# Altium PCB OpenRex_V1I1_PCB.PcbDoc (part 8 of 12)
Units mm, origin at the board's own origin, x right, y up, seen from the top; angles counter-clockwise.
Board outline 70 x 95 mm, 10 copper layers (L1, L2, L3, L4 (PWR), L5 (PWR), L6 (PWR), L7 (PWR), L8, L9, L10), stack 1.632 mm thick; 1080 components, 708 nets, 3831 pads, 2373 vias.
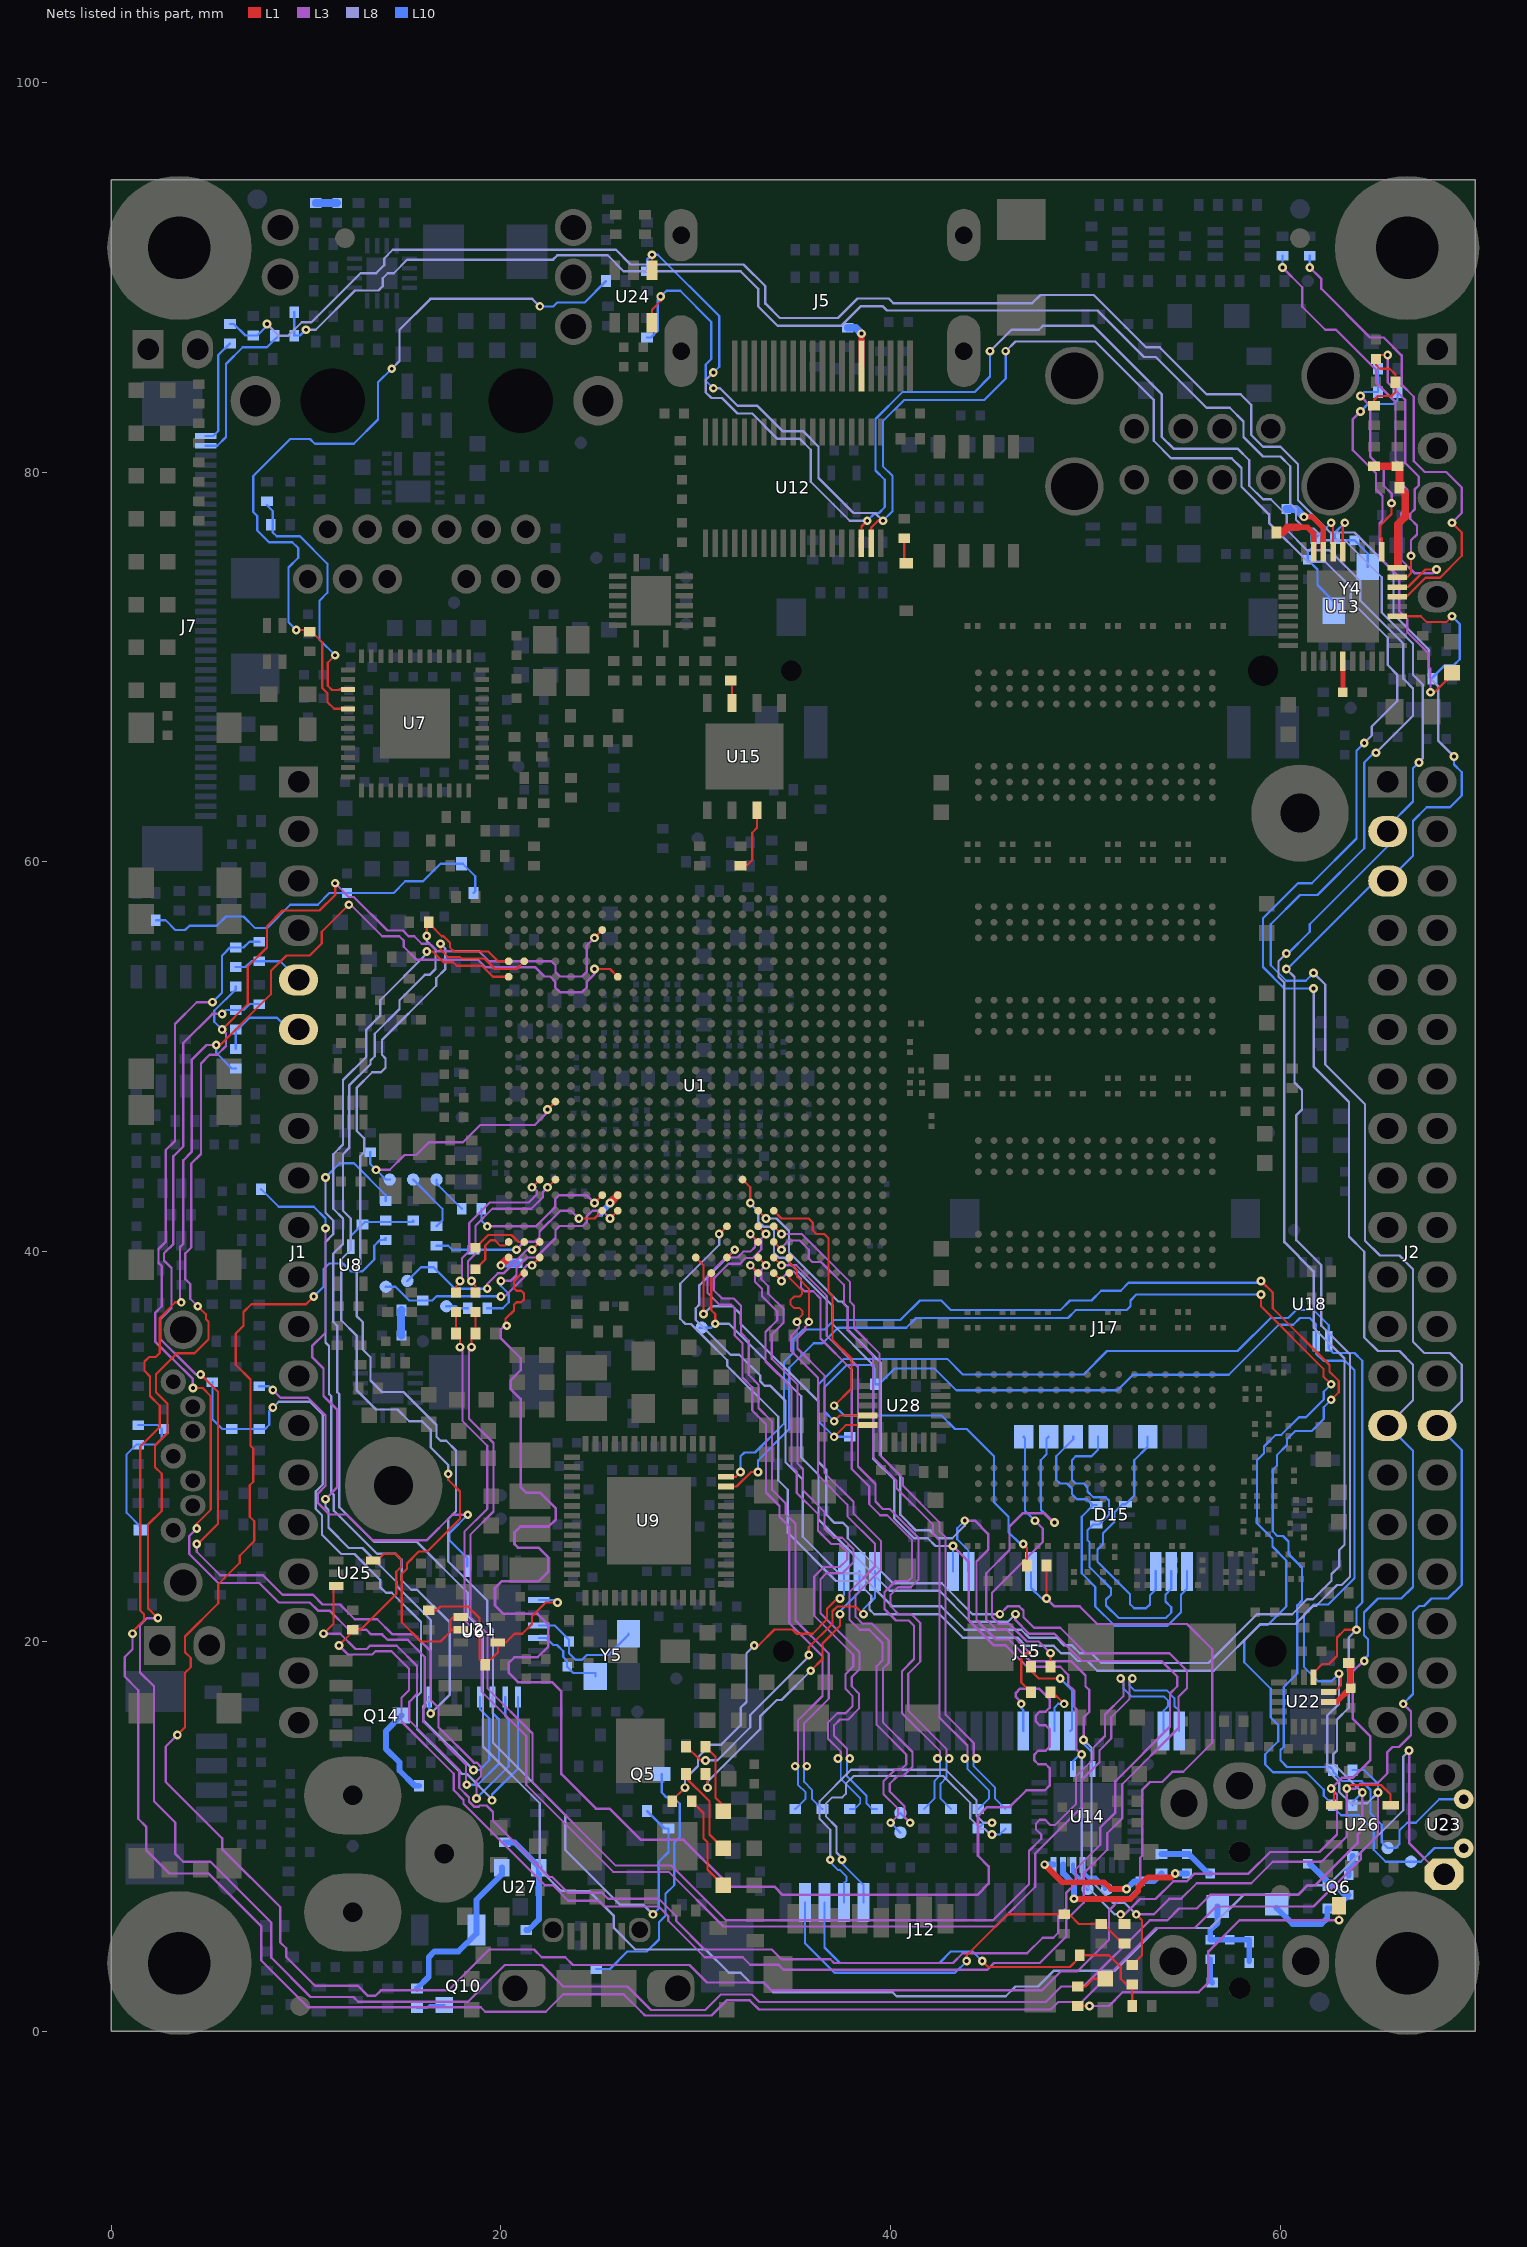
[diagram p16: the nets of this part, all layers, seen from the top]

## Via types
v1: diameter 0.45, hole 0.2, L1 to L10, tented both sides, 2369 vias
v2: diameter 1, hole 0.5, L1 to L10, tented top, 4 vias

## Nets (pads, with @x,y where several pads share a name; then routed paths per layer and width w, separated by ;. In a path a pad name is that pad's centre, name@x,y a point inside that pad or via, vN(x,y) a via of type N, cw(c..) or ccw(c..) an arc to the next point about the centre after c; other vN are vias at no path point) (continued)
HP_OUT_L: C285.1 C289.1 C290.2 FB22.1 R231.2 | length 5
  L10 w0.3: C290.2@56.775,6.4 56.775,5.575 56.4,5.2 C285.1@56.4,4.7 C289.1@57.4,4.7 58.4,4.7 FB22.1@58.4,3.6
HP_OUT_R: C284.1 C288.1 C291.2 FB21.1 R230.2 | length 7.7
  L10 w0.3: C291.2@59.8,6.325 60.625,5.5 62.1,5.5 62.4,5.8 C288.1@62.4,6.3 62.8,6.3 C284.1@63.5,7 63.3,7 62.8,7.5 62.5,7.5 62.5,7.6 FB21.1@61.5,8.6
HUB_CFG_SEL0: R221.2 U13.24 | length 24.3
  L1 w0.114: U13.24@66,73.6 66.462,73.6 67.442,74.58 68.18,74.58 69.3,75.7 69.3,76.9 v1(68.8,77.4)
  L3 w0.12: v1(61.5,90.5) 62.1,89.9 62.1,89.4 64.6,86.9 65.3,86.9 66.215,85.985 66.215,84.485 66.84,83.86 66.84,80.56 67.4,80 68.5,80 69.3,79.2 69.3,77.9 v1(68.8,77.4)
  L10 w0.114: v1(61.5,90.5) R221.2@61.5,91.1
HUB_CFG_SEL1: R220.2 U13.25 | length 23.2
  L1 w0.114: U13.25@66,74.1 66.544,74.1 67.444,75 v1(68,75)
  L3 w0.12: v1(60.1,90.5) 61.115,89.485 61.115,88.485 62.3,87.3 62.844,87.3 64.9,85.244 64.9,84.6 65.9,83.6 65.9,80.6 66.1,80.4 66.1,79.5 66.5,79.1 66.5,78.2 66.2,77.9 66.2,75.5 66.9,74.8 67.8,74.8 v1(68,75)
  L10 w0.114: v1(60.1,90.5) R220.2@60.1,91.1
HUB_CRFILT: C254.1 U13.14 | length 1.6
  L1 w0.25: C254.1@63.2,68.7 U13.14@63.2,70.3
HUB_LED: D12.2 R219.1 | length 20.4
  L1 w0.114: v1(67.7,68.7) 67.9,68.7 68.8,69.6 D12.2@68.8,69.7
  L3 w0.12: v1(64.1,83.1) 63.715,82.715 63.715,81.12 64.9,79.935 64.9,79.1 65.235,78.765 65.235,77.535 65.1,77.4 65.1,75.6 66.1,74.6 66.1,72.86 66.5,72.46 66.5,71.8 67.6,70.7 67.6,70 67.7,69.9 v1(67.7,68.7)
  L10 w0.114: v1(64.1,83.1) 64.485,83.485 65.785,83.485 66,83.7 R219.1@66,84.1
HUB_NON_REM1: R224.2 U13.22 | length 7.3
  L1 w0.114: U13.22@66,72.6 67.2,72.6 67.5,72.3 68.5,72.3 v1(68.8,72.6)
  L10 w0.114: R224.2@67.8,69.4 67.8,69.456 68.444,70.1 68.9,70.1 69.2,70.4 69.2,72.2 v1(68.8,72.6)
HUB_PLLFILT: C253.1 U13.34 | length 3.5
  L1 w0.28: v1(61.2,77.7) 61.635,77.7 62.2,77.135 U13.34@62.2,75.9
  L10 w0.4: C253.1@60.3,78.1 60.8,78.1 v1(61.2,77.7)
HUB_RBIAS: R222.1 U13.35 | length 3.1
  L1 w0.28: 60.9,77.165 61.393,77.165 61.7,76.858 U13.35@61.7,75.9
  L1 w0.4: R222.1@59.8,76.9 60.1,76.9 60.365,77.165 60.9,77.165
HUB_RESETN: C416.1 R217.1 R218.1 U13.26 | length 17.8
  L1 w0.114: R217.1@64.8,83.4 64.8,83.7 65,83.9 65.7,83.9 65.9,84.1 R218.1@65.9,84.6 65.9,85 65.6,85.3 65.1,85.3 64.9,85.5 C416.1@64.9,85.8 65.1,86 v1(65.5,86) ; U13.26@66,74.6 66.5,74.6 66.7,74.8 v1(66.7,75.7)
  L3 w0.12: v1(65.5,86) 65.5,84.6 66.4,83.7 66.4,80.459 67.1,79.759 67.1,79.318 66.88,79.098 66.88,78.08 66.656,77.856 66.656,77.6 67,77.256 67,76.8 66.7,76.5 v1(66.7,75.7)
HUB_VBUS_DET: R169.1 R215.2 R216.1 U13.27 | length 6.7
  L1 w0.28: U13.27@66,75.1 U13.27@66,75.175
  L1 w0.4: R169.1@64.8,80.3 R215.2@66,80.3 66.1,80.2 R216.1@66.1,79.2 66.4,78.9 66.4,77.7 66.025,77.325 U13.27@66.025,75.175
HUB_XTALIN: C415.1 R358.2 U13.33 Y4.3 | length 7.1
  L1 w0.114: v1(62.6,77.4) 62.7,77.3 U13.33@62.7,75.9
  L10 w0.114: v1(62.6,77.4) R358.2@61.8,76.6 61.8,76.3 61.4,75.9 C415.1@61.4,75.5 61.9,75 61.9,74.2 62.725,73.375 Y4.3@62.725,72.875
HUB_XTALOUT: C242.1 R358.1 U13.32 Y4.1 | length 5.2
  L1 w0.114: U13.32@63.2,75.9 63.2,77.3 v1(63.3,77.4)
  L10 w0.114: v1(63.3,77.4) 62.8,76.9 R358.1@62.8,76.6 62.9,76.5 C242.1@63.8,76.5 64.475,75.825 Y4.1@64.475,75.125
I2C1_SCL: R132.1 R238.1 R278.1 U1.H20 U18.6 U22.4 U28.11 | length 218
  L1 w0.114: v1(1.1,20.4) 1.1,20.5 1.685,21.085 1.685,21.409 1.5,21.594 1.5,30 2.5,31 2.5,32.1 2,32.6 2,33.6 1.715,33.885 1.715,34.359 1.956,34.6 2.3,34.6 2.5,34.8 2.5,36.6 3.3,37.4 v1(3.6,37.4) ; v1(5.4,50.6) 5.6,50.6 8.2,53.2 8.2,54.4 9,55.2 10.2,55.2 10.815,55.815 10.815,56.415 v1(12.2,57.8) ; v1(24.8,54.5) 25.6,54.5 U1.H20@26,54.1 ; v1(37.1,31.3) 37.4,31.6 U28.11@38.825,31.6 ; U22.4@62.475,17.4 62.751,17.4 63.1,17.749 63.1,18.25 v1(63,18.35)
  L3 w0.12: v1(1.1,20.4) 1.1,19.6 0.7,19.2 0.7,18.2 1.4,17.5 1.4,10.9 1.8,10.5 1.8,9.3 3,8.1 5,8.1 7.7,5.4 7.7,3.644 10.109,1.235 18.965,1.235 19.2,1 22.3,1 23.2,1.9 26.3,1.9 27.2,1 27.39,0.81 30.8,0.81 31.575,1.585 32.775,1.585 33.245,1.115 48.215,1.115 48.6,1.5 49.8,1.5 53.6,5.3 55.6,5.3 56.7,6.4 61.7,6.4 64.115,8.815 64.115,9.171 65,10.056 v1(65,12.25) ; v1(3.6,37.4) 3.535,37.465 3.535,40.235 3.7,40.4 3.7,44.684 4.135,45.119 4.135,49.835 4.9,50.6 v1(5.4,50.6) ; v1(12.2,57.8) 12.3,57.8 13.915,56.185 14.789,56.185 15.015,55.959 15.015,55.641 15.671,54.985 18.815,54.985 19.2,54.6 21.756,54.6 22.241,54.115 22.529,54.115 22.785,53.859 22.785,53.571 23.041,53.315 24.159,53.315 24.415,53.571 24.415,53.859 24.8,54.244 v1(24.8,54.5)
  L8 w0.12: v1(63,18.35) 63,16.8 62.4,16.2 62.4,13.4 63.015,12.785 63.015,12.285 63.6,11.7 64.45,11.7 v1(65,12.25)
  L10 w0.114: v1(5.4,50.6) 5.4,50.2 6.2,49.4 R278.1@6.4,49.4 ; v1(37.1,31.3) 36.6,31.8 36.6,33.044 37.741,34.185 39.015,34.185 39.2,34 R132.1@39.2,33.2 39.4,33.2 40.2,34 42.256,34 43.371,32.885 51.635,32.885 52.435,33.685 57.341,33.685 59.906,36.25 60.65,36.25 61,36.6 61.5,36.6 61.825,36.275 U18.6@61.825,35.4 61.825,34.775 62.2,34.4 63.315,34.4 63.8,33.915 63.8,23.244 62.456,21.9 61.7,21.9 61.2,21.4 61.2,18.7 61.935,17.965 62.615,17.965 v1(63,18.35) ; R238.1@63.7,13.4 64.3,13.4 65,12.7 v1(65,12.25)
I2C1_SCL_CON: J1.6 R278.2 R279.2 | length 4.7
  L10 w0.114: R278.2@6.4,50.4 R279.2@6.4,51.4 6.5,51.4 7.1,52 8.52,52 9.12,51.4 J1.6@9.62,51.4
I2C1_SCL_MCU: R279.1 R291.1 U6.10 | length 62.3
  L1 w0.114: v1(4.4,25) 4.444,25 5.485,26.041 5.485,32.815 v1(4.6,33.7)
  L3 w0.12: v1(4.4,25) 4.4,24.6 5.6,23.4 7.8,23.4 8.8,22.4 10.356,22.4 10.856,21.9 11.74,21.9 12.5,21.14 13.66,21.14 14.435,20.365 15.535,20.365 16.415,19.485 16.415,16.985 16.8,16.6 16.8,15.6 18.615,13.785 18.759,13.785 18.985,13.559 18.985,13.085 18.75,12.85 v1(18.75,11.95) ; v1(4.6,33.7) 4.361,33.7 3.231,34.83 3.22,34.83 2.54,35.51 2.54,36.54 3.1,37.1 3.1,39.156 2.715,39.541 2.715,39.915 3.2,40.4 3.2,44.9 3.7,45.4 3.7,50.7 5.2,52.2 v1(5.7,52.2)
  L10 w0.114: v1(5.7,52.2) 5.9,52.4 R279.1@6.4,52.4 6.8,52.4 7.1,52.7 R291.1@7.6,52.7 ; v1(18.75,11.95) 20.4,13.6 20.4,16 20.225,16.175 U6.10@20.225,17.15
I2C1_SCL_PMIC: R238.2 TP18.1 U9.54 | length 78.2
  L1 w0.114: U9.54@31.55,28.45 32.05,28.45 v1(32.3,28.7) ; v1(59,38.5) 59.6,37.9 59.6,37.1 62.515,34.185 62.515,33.841 62.985,33.371 62.985,32.785 v1(62.6,32.4)
  L1 w0.4: v2@69.35,11.95 v2(69.4,11.9)
  L10 w0.114: v1(32.3,28.7) 32.3,29.5 32.5,29.7 33.044,29.7 34.52,31.176 34.52,34.32 35,34.8 35,35.5 35.5,36 36.6,36 37.1,36.5 40.5,36.5 41.5,37.5 42.6,37.5 43.1,37 48.7,37 49.2,37.5 50.3,37.5 50.8,38 51.8,38 52.2,38.4 58.9,38.4 v1(59,38.5) ; v1(62.6,32.4) 62.215,32.015 62.215,31.415 61.6,30.8 60.756,30.8 60.335,30.38 60.335,30.08 59.815,29.559 59.815,29.241 59.815,29.015 59.598,28.798 59.598,25.658 59.841,25.415 60.129,25.415 60.415,25.129 60.415,24.485 61.1,23.8 61.1,22.1 60.86,21.86 60.86,18.36 60.165,17.665 60.165,14.6 60,14.435 60,13.9 60.335,13.565 62.535,13.565 R238.2@62.7,13.4 62.7,13.3 63.165,12.835 64.165,12.835 64.615,12.385 64.615,11.185 65.2,10.6 65.2,9.7 TP18.1@65.5,9.4 65.9,9.4 66.1,9.6 66.1,10.3 66.5,10.7 66.942,10.7 68.142,11.9 v2(69.4,11.9)
I2C1_SDA: R28.1 R247.1 R276.1 U1.G23 U18.5 U22.6 U28.12 | length 218.7
  L1 w0.114: v1(2.4,21.2) 1.9,21.7 1.9,26 2.6,26.7 2.6,28.6 2.258,28.942 2.258,30.058 2.9,30.7 2.9,32.2 2.3,32.8 2.3,33.7 3.385,34.785 4.285,34.785 5,35.5 5,36.406 4.865,36.541 4.865,36.785 v1(4.45,37.2) ; v1(5.7,51.4) 7.015,52.715 7.015,54.615 8,55.6 8,56.7 8.8,57.5 10.7,57.5 11.5,58.3 v1(11.5,58.9) ; v1(24.8,56.1) U1.G23@25.2,56.5 ; v1(37.1,30.5) 37.7,31.1 U28.12@38.825,31.1 ; U22.6@61.7,18.175 61.7,18.4 62.144,18.844 62.494,18.844 62.9,19.25 62.9,20.2 63.3,20.6 v1(63.9,20.6)
  L3 w0.12: v1(2.4,21.2) 1.844,21.2 1.485,20.841 1.485,18.415 2.2,17.7 2.2,11.8 3.3,10.7 3.3,9.1 3.7,8.7 5.1,8.7 8.215,5.585 8.215,3.781 10.24,1.756 12.444,1.756 12.685,1.515 18.315,1.515 20.2,3.4 22.104,3.4 23.204,2.3 26.5,2.3 27.71,1.09 30.49,1.09 31.285,1.885 32.871,1.885 33.256,1.5 47.956,1.5 48.756,2.3 49.9,2.3 53.3,5.7 54.2,5.7 54.8,6.3 55.7,6.3 56.4,7 60.9,7 61.4,7.5 61.8,7.5 63.956,9.656 63.956,10.1 64.2,10.344 v1(64.2,12.25) ; v1(4.45,37.2) 4.065,37.585 4.065,38.335 3.815,38.585 3.815,39.915 4.12,40.22 4.12,44.52 4.615,45.015 4.615,49.659 5.056,50.1 5.444,50.1 5.9,50.556 5.9,51.2 v1(5.7,51.4) ; v1(11.5,58.9) 12.2,58.2 12.456,58.2 14.181,56.475 14.975,56.475 15.265,56.185 15.559,56.185 15.944,55.8 16.344,55.8 16.729,55.415 18.885,55.415 19.4,54.9 22.6,54.9 22.8,54.7 22.8,54.356 23.041,54.115 24.159,54.115 24.4,54.356 24.4,55.7 v1(24.8,56.1)
  L8 w0.12: v1(63.9,20.6) 63.5,20.2 63.5,16.6 62.9,16 62.9,14.4 62.7,14.2 62.7,13.75 v1(64.2,12.25)
  L10 w0.114: v1(5.7,51.4) 5.3,51.8 5.3,52.356 6.4,53.456 R276.1@6.4,53.6 ; R28.1@37.9,30.5 v1(37.1,30.5) 36.3,31.3 36.3,33.2 37.6,34.5 42.9,34.5 43.7,33.7 49.9,33.7 51.1,34.9 57.8,34.9 59.5,36.6 60.4,36.6 60.8,37 61.7,37 62.475,36.225 U18.5@62.475,35.4 62.475,35.025 62.7,34.8 63.8,34.8 64.2,34.4 64.2,22 63.9,21.7 v1(63.9,20.6) ; R247.1@63.7,11.6 63.7,11.75 v1(64.2,12.25)
I2C1_SDA_CON: J1.5 R276.2 R277.2 | length 3.8
  L10 w0.114: R276.2@6.4,54.6 6.9,54.6 7.2,54.9 R277.2@7.6,54.9 8.68,54.9 9.62,53.96 J1.5@9.62,53.94
I2C1_SDA_MCU: R277.1 R290.1 U6.11 | length 64.5
  L1 w0.114: v1(4.2,33) 4.7,33 5.12,32.58 5.12,26.764 4.4,26.044 v1(4.4,25.8)
  L3 w0.12: v1(4.2,33) 4.2,33.466 3.116,34.55 3.104,34.55 2.26,35.394 2.26,36.86 2.6,37.2 2.6,39.26 2.435,39.425 2.435,40.135 2.8,40.5 2.8,45.2 3.285,45.685 3.285,51.685 4.4,52.8 v1(5.2,52.8) ; v1(4.4,25.8) 4.015,25.415 4.015,24.485 5.5,23 7.6,23 8.6,22 10.2,22 10.615,21.585 11.215,21.585 12.2,20.6 13.106,20.6 13.341,20.365 13.907,20.365 14.187,20.085 15.215,20.085 16.1,19.2 16.1,16.629 16.015,16.544 16.015,15.885 18.215,13.685 18.215,12.685 v1(18.25,12.65) ; v1@18.3,12.7 v1@18.4,12.6
  L10 w0.114: v1(5.2,52.8) 5.7,53.3 5.7,55.2 6.1,55.6 R290.1@6.4,55.6 6.8,55.6 7.1,55.9 R277.1@7.6,55.9 ; v1(18.25,12.65) 18.815,12.65 19.9,13.735 19.9,16 19.575,16.325 U6.11@19.575,17.15
I2C1_SDA_PMIC: R247.2 TP21.1 U9.53 | length 77.7
  L1 w0.114: U9.53@31.55,27.95 32.094,27.95 32.844,28.7 v1(33.2,28.7) ; v1(59,37.8) 59,37.2 62.2,34 62.2,33.6 v1(62.6,33.2)
  L1 w0.4: v2@69.35,9.45 v2@69.4,9.4
  L10 w0.114: v1(33.2,28.7) 33.2,29.3 34.8,30.9 34.8,34.044 36.056,35.3 36.5,35.3 37.3,36.1 40.8,36.1 41.3,36.6 49.1,36.6 49.5,37 52.1,37 52.3,37.2 52.3,37.5 52.6,37.8 v1(59,37.8) ; v1(62.6,33.2) 62.215,32.815 62.215,32.411 61.304,31.5 60.944,31.5 60.044,30.6 59.756,30.6 59.157,30.002 59.157,29.657 58.8,29.3 58.8,26.06 59.585,25.275 59.585,24.871 60.3,24.156 60.3,21.8 59.36,20.86 58.937,20.86 58.14,20.063 58.14,18.937 59.5,17.577 59.5,16.1 59.885,15.715 59.885,14.885 59.215,14.215 59.215,13.685 59.615,13.285 61.321,13.285 62.215,12.391 62.215,12.085 R247.2@62.7,11.6 62.7,11.5 63.115,11.085 64.015,11.085 64.785,10.315 64.785,9.315 65.4,8.7 TP21.1@66.7,8.7 67.2,8.7 67.9,9.4 v2@69.4,9.4
  other v2: 69.4,9.39
I2C2_CSI_SCL: J12.13 R53.1 R154.2 R191.2 | length 21.4
  L1 w0.114: v1(44.7,3.6) 45,3.3 49.2,3.3 49.7,3.8 R53.1@49.7,3.9 51.2,3.9 51.8,3.3 51.8,2.7 52.1,2.4 R154.2@52.4,2.4 R191.2@52.4,1.3
  L10 w0.114: J12.13@36.6,6.6 36.6,4.3 37.4,3.5 42.5,3.5 43.1,4.1 44.2,4.1 v1(44.7,3.6)
I2C2_CSI_SDA: J12.14 R52.1 R54.2 R156.2 | length 21.1
  L1 w0.114: v1(43.9,3.6) 43.9,3.9 46,6 R52.1@48.9,6 49.156,6 49.656,5.5 R54.2@50.8,5.5 50.9,5.5 51.9,4.5 R156.2@52,4.5
  L10 w0.114: J12.14@35.6,6.6 35.6,4.52 37.12,3 43.3,3 v1(43.9,3.6)
I2C2_SCL: J2.28 J15.30 R134.1 R154.1 U1.U5 U12.17 U14.29 U24.1 U26.6 | length 220
  L1 w0.114: U24.1@27.75,90.45 v1(27.75,91.15) ; U1.U5@33.2,42.1 v1(33.6,41.7) ; U12.17@38.5,76.35 38.5,77.2 v1(38.8,77.5) ; R154.1@52.4,3.4 52.9,3.9 52.9,5.7 v1(52.6,6) ; v1(63.4,12.45) 63.585,12.635 65.159,12.635 65.65,12.144 U26.6@65.65,11.6
  L3 w0.12: v1(43.8,26.2) 44.319,26.2 45,25.519 45,24.7 44.4,24.1 44.4,21.1 45.4,20.1 46.056,20.1 47.176,18.98 49.275,18.98 50,18.255 50,17.7 50.185,17.515 50.185,16.385 49.9,16.1 v1(49.9,14.95) ; v1(52.6,6) 53.5,6 54.3,6.8 54.9,6.8 55.7,7.6 58.5,7.6 59.6,8.7 62.1,8.7 63.4,10 v1(63.4,12.45) 63.85,12.45 64.1,12.7 64.944,12.7 65.485,13.241 65.485,14.329 65.741,14.585 66.085,14.585 66.7,15.2 66.7,16.4 v1(66.3,16.8)
  L8 w0.12: v1(30.9,85.1) 30.515,84.715 30.515,84.085 30.8,83.8 31.344,83.8 32.144,83 32.9,83 34.2,81.7 35.344,81.7 35.9,81.144 35.9,79.5 37.9,77.5 v1(38.8,77.5) ; v1(33.6,41.7) 34.144,41.7 34.785,41.059 34.785,39.971 37.311,37.444 37.5,37.444 37.8,37.144 37.8,36 39.5,34.3 39.5,29.5 40.5,28.5 40.5,26.5 41.3,25.7 42.025,25.7 42.425,25.3 43.156,25.3 43.8,25.944 v1(43.8,26.2) ; v1(45.1,86.2) 46.2,87.3 47.6,87.3 47.8,87.5 50.4,87.5 53.9,84 53.9,81.81 54.51,81.2 57.8,81.2 58.4,80.6 58.4,79.3 59.1,78.6 59.5,78.6 60.32,77.78 60.32,77.036 61.366,75.99 62.51,75.99 64.1,74.4 64.1,73.4 66.3,71.2 66.3,69.4 66.8,68.9 66.8,67.5 v1(64.9,65.6) ; v1(49.9,14.95) 50.3,14.55 50.3,7.7 51.4,6.6 52,6.6 v1(52.6,6) ; v1(61.7,54.3) 62.3,53.7 62.3,49.6 64.34,47.56 64.34,40.56 65.1,39.8 66.1,39.8 66.8,39.1 66.8,35.38 67.38,34.8 68.7,34.8 69.3,34.2 69.3,32.34 J2.28@68.04,31.08
  L10 w0.114: R134.1@27.5,90.3 27.5,90.9 v1(27.75,91.15) 28.05,91.15 31.2,88 31.2,85.4 v1(30.9,85.1) ; v1(38.8,77.5) 39.2,77.9 39.4,77.9 39.7,78.2 39.7,79.6 39.22,80.08 39.22,82.72 40.6,84.1 44.3,84.1 45.1,84.9 v1(45.1,86.2) ; v1(43.8,26.2) 43.412,25.813 43.412,25.243 44,24.656 J15.30@44,23.6 ; v1(49.9,14.95) 49.9,14.744 50.33,14.314 50.33,13.47 U14.29@50.35,13.45 ; v1(61.7,54.3) 61.3,53.9 60.3,53.9 59.5,54.7 59.5,56.8 61,58.3 61.9,58.3 64.3,60.7 64.3,65.1 64.8,65.6 v1(64.9,65.6) ; v1(66.3,16.8) 66.8,17.3 66.8,21.5 67.115,21.815 67.359,21.815 67.744,22.2 68.6,22.2 69.3,22.9 69.3,29.82 J2.28@68.04,31.08
I2C2_SDA: J2.27 J15.32 R133.1 R156.1 U1.T7 U12.18 U14.27 U24.6 U26.1 | length 208.2
  L1 w0.114: U24.6@27.75,87.65 27.75,88.331 28.2,88.781 v1(28.2,89) ; U1.T7@32.4,43.7 32.8,43.3 v1(32.8,42.5) ; U12.18@39,76.35 39,77.156 39.344,77.5 v1(39.6,77.5) ; v1(51.8,6) 51.8,5.7 R156.1@52,5.5 ; v1(62.6,12.45) 62.75,12.3 U26.1@62.75,11.6
  L3 w0.12: v1(43.2,24.9) 44,24.1 44,21.1 45.3,19.8 45.9,19.8 47,18.7 48.7,18.7 49.115,18.285 49.115,17.785 49.415,17.485 49.415,16.641 49.515,16.541 49.515,14.485 v1(49.8,14.2) ; v1(51.8,6) 52,6 52.785,6.785 53.589,6.785 54.504,7.7 55.2,7.7 55.59,8.09 58.36,8.09 59.47,9.2 62,9.2 62.9,10.1 62.9,12.15 v1(62.6,12.45) 63.15,13 63.7,13 64.6,13.9 64.6,15.144 63.7,16.044 63.7,18.444 ; v1(64.3,19) 64.256,19 63.7,18.444 ; v1@64.3,19.05 63.7,18.45 63.7,18.444
  L8 w0.12: v1(30.9,84.3) 31.244,84.3 32.149,83.395 33.161,83.395 34.456,82.1 35.5,82.1 36.3,81.3 36.3,79.7 38.1,77.9 39.2,77.9 v1(39.6,77.5) ; v1(32.8,42.5) 32.8,42.47 33.2,42.07 33.2,41.556 33.471,41.285 33.815,41.285 34.015,41.085 34.015,39.941 34.271,39.685 34.559,39.685 37,37.244 37,36.3 39.1,34.2 39.1,29.392 40.185,28.307 40.185,26.315 41.2,25.3 41.9,25.3 42.3,24.9 v1(43.2,24.9) ; v1(45.9,86.2) 46.4,86.7 50.5,86.7 53.5,83.7 53.5,81.6 54.4,80.7 57.5,80.7 58,80.2 58,79.24 59.415,77.825 59.415,77.391 61.406,75.4 62.3,75.4 63.6,74.1 63.6,73.4 65.5,71.5 65.5,70.1 65.985,69.615 65.985,68.241 64.685,66.941 64.685,66.485 v1(64.3,66.1) ; v1(49.8,14.2) 49.8,7.7 51.5,6 v1(51.8,6) ; v1(61.7,53.5) 61.7,49.5 63.515,47.685 63.515,40.785 64.3,40 64.3,35.6 65,34.9 66.1,34.9 66.8,34.2 66.8,32.38 J2.27@65.5,31.08
  L10 w0.114: R133.1@27.5,86.9 27.7,86.9 28.05,87.25 28.05,88.85 v1(28.2,89) 28.5,89.3 29.2,89.3 30.8,87.7 30.8,85.8 30.515,85.515 30.515,84.685 v1(30.9,84.3) ; v1(39.6,77.5) 40.1,78 40.1,79.8 39.6,80.3 39.6,82.6 40.7,83.7 44.8,83.7 45.9,84.8 v1(45.9,86.2) ; J15.32@43.2,23.6 v1(43.2,24.9) ; U14.27@49.35,13.45 49.35,13.85 49.7,14.2 v1(49.8,14.2) ; v1(61.7,53.5) 60.2,53.5 59.1,54.6 59.1,57.1 60.9,58.9 61.6,58.9 63.9,61.2 63.9,65.7 v1(64.3,66.1) ; v1@64.3,19.1 64.485,19.285 64.485,20.115 64.285,20.315 64.285,21.485 65,22.2 66.2,22.2 66.8,22.8 66.8,29.78 J2.27@65.5,31.08
I2C3_CSI1_SCL: J7.40 R196.1 | length 5.5
  L10 w0.114: J7.40@4.85,81.85 5.25,81.85 5.5,82.1 5.5,86 R196.1@6.1,86.6
I2C3_CSI1_SDA: J7.39 R195.1 | length 8.1
  L10 w0.114: J7.39@4.85,81.35 5.45,81.35 5.9,81.8 5.9,85.544 6.756,86.4 8,86.4 R195.1@8.5,86.9
I2C3_SCL: J2.5 R142.1 R196.2 U1.R4 | length 186
  L1 w0.114: v1(31.2,40.9) U1.R4@31.6,41.3
  L8 w0.12: v1(8,87.6) 8.6,87 9.1,87 9.785,87.685 10.285,87.685 12.8,90.2 13.6,90.2 14.015,90.615 14.015,90.959 14.455,91.399 25.906,91.399 26.656,90.65 32.45,90.65 33.571,89.529 33.571,88.641 34.311,87.9 37.3,87.9 38.3,88.9 39.9,88.9 40.135,88.665 47.265,88.665 47.685,89.085 50.415,89.085 53.1,86.4 53.8,86.4 56.215,83.985 57.959,83.985 58.5,83.444 58.5,81.9 59.1,81.3 60,81.3 60.9,80.4 60.9,78.556 62.556,76.9 63.8,76.9 65.8,74.9 65.8,72.7 67.615,70.885 67.615,69.485 68.1,69 68.1,66.2 v1(68.9,65.4) ; v1(31.2,40.9) 31.2,40.356 29.2,38.356 29.2,36.556 29.471,36.285 29.759,36.285 30.6,35.444 31.615,34.429 31.615,34.141 34.23,31.526 34.23,28.27 34.715,27.785 34.715,25.585 37.2,23.1 38.244,23.1 39,22.344 39,22.056 38.915,21.971 38.915,21.641 39.156,21.4 42.5,21.4 43.7,20.2 46.5,20.2 46.915,19.785 47.2,19.785 48.359,19.785 48.744,19.4 49.2,19.4 49.6,19 50.1,19 50.6,18.5 56.577,18.5 58.977,20.9 60.764,20.9 61.7,21.836 61.836,21.836 62.9,22.9 63.144,22.9 63.565,23.321 63.565,34.735 62.1,36.2 62.1,39.3 60.815,40.585 60.815,47.015 61.1,47.3 61.1,48.3 60.715,48.685 60.715,54.085 v1(60.3,54.5)
  L10 w0.114: R196.2@6.1,87.6 6.3,87.6 6.9,87 R142.1@7.3,87 7.5,87 8,87.5 v1(8,87.6) ; v1(60.3,54.5) 60.344,54.5 64.864,59.02 J2.5@65.5,59.02 66.8,60.32 66.8,62.1 67.5,62.8 68.7,62.8 69.3,63.4 69.3,64.6 68.9,65 v1(68.9,65.4)
I2C3_SDA: J2.3 R137.1 R195.2 U1.R2 | length 176.6
  L1 w0.114: U1.R2@31.6,39.7 v1(32,40.1)
  L8 w0.12: v1(10,87.3) 10.5,87.3 12.515,89.315 13.715,89.315 13.941,89.541 13.941,89.941 14.2,90.2 14.5,90.2 15.2,90.9 22.681,90.9 22.9,91.119 25.481,91.119 26.3,90.3 32.3,90.3 33.2,89.4 33.2,88.504 34.204,87.5 37.456,87.5 38.456,88.5 39.6,88.5 39.815,88.285 50.615,88.285 53,85.9 53.6,85.9 56.2,83.3 57.4,83.3 58.1,82.6 58.1,81.8 59.1,80.8 60,80.8 60.5,80.3 60.5,78.4 60.8,78.1 60.8,77.556 61.271,77.085 61.715,77.085 62.3,76.5 63.3,76.5 65.2,74.6 65.2,72.79 66.8,71.19 66.8,69.6 67.3,69.1 67.3,65.3 v1(67.1,65.1) ; v1(32,40.1) 32,40.09 30.185,38.275 30.185,37.285 30,37.1 30,36.5 31.785,34.715 32.229,34.715 33.315,33.629 33.315,33.341 33.541,33.115 33.829,33.115 34.6,32.344 34.6,29.2 35.485,28.315 35.485,25.371 37.356,23.5 38.4,23.5 40.1,21.8 42.6,21.8 43.8,20.6 46.7,20.6 47.1,20.2 48.5,20.2 48.9,19.8 49.3,19.8 49.7,19.4 50.3,19.4 50.8,18.9 56.3,18.9 58.8,21.4 60.6,21.4 61.366,22.166 61.666,22.166 62.615,23.115 62.615,23.459 63.01,23.854 63.01,24.69 63.285,24.965 63.285,34.515 61.7,36.1 61.7,38.989 60.2,40.489 60.2,53.8 59.9,54.1 59.9,54.9 v1(60.3,55.3)
  L10 w0.114: R137.1@9.4,88.2 R195.2@9.4,87 9.7,87 v1(10,87.3) ; v1(60.3,55.3) 60.385,55.3 61.5,56.415 61.5,56.8 65.5,60.8 J2.3@65.5,61.56 65.5,61.8 66.8,63.1 66.8,64.8 v1(67.1,65.1)
IR_RCV: U1.A20 U23.1 | length 121.6
  L1 w0.114: v1(16.2,55.4) 16.5,55.4 17.055,54.845 17.555,54.845 17.732,54.668 19.032,54.668 19.6,54.1 U1.A20@20.4,54.1
  L3 w0.12: v1(66.6,14.4) 66.6,9.656 68.196,8.06 U23.1@68.4,8.06
  L8 w0.12: v1(16.2,55.4) 16.2,55.29 13.81,52.9 13.81,52.11 13.1,51.4 13.1,50.004 11.9,48.804 11.9,45.5 11.4,45 11.4,42.2 11.9,41.7 11.9,40.4 11.4,39.9 11.4,36.4 11.6,36.2 11.6,32.8 11.715,32.685 11.715,26.885 13.5,25.1 15.7,25.1 18.3,22.5 18.3,21.3 19.085,20.515 19.085,14.615 22,11.7 22,8.3 23.1,7.2 24.519,7.2 25.8,5.919 25.8,5.3 26.9,4.2 30.5,4.2 31.7,3 32.3,3 32.8,2.5 33.475,2.5 33.975,2 40.1,2 40.3,1.8 45.9,1.8 46.4,2.3 47.56,2.3 48.36,3.1 51.5,3.1 53.7,5.3 56.4,5.3 58.1,7 60.9,7 61.4,7.5 62.456,7.5 66.3,11.344 66.3,14.1 v1(66.6,14.4)
JTAG_MOD: R61.2 U1.H6 | length 1.3
  L1 w0.4: v1(25.6,42.5) U1.H6@26,42.9
  L10 w0.3: R61.2@25.1,41.965 25.6,42.465 v1(25.6,42.5)
JTAG_NTRST: R62.1 TP1.1 U1.C2 | length 9.4
  L1 w0.114: v1(21.6,39.3) U1.C2@22,39.7
  L3 w0.12: v1(20,37.7) 20.2,37.7 21.2,38.7 21.2,39.164 21.336,39.3 v1(21.6,39.3)
  L10 w0.114: TP1.1@14.1,38.2 14.6,38.2 15.3,37.5 R62.1@16,37.5 16.485,37.5 16.7,37.715 19.985,37.715 v1(20,37.7)
JTAG_TCK: R92.2 TP12.1 | length 1.1
  L10 w0.114: TP12.1@17.2,37.2 17.7,37.2 17.8,37.1 R92.2@18.3,37.1
JTAG_TCK_R: R92.1 U1.H5 | length 10.9
  L1 w0.114: v1(25.6,41.7) U1.H5@26,42.1
  L3 w0.12: v1(20,38.5) 20.5,38.5 20.8,38.8 20.8,39.16 21.34,39.7 21.8,39.7 22.8,40.7 22.8,41.1 23.015,41.315 24.2,41.315 24.4,41.515 24.4,41.8 24.7,42.1 25.2,42.1 v1(25.6,41.7)
  L10 w0.114: R92.1@19.3,37.1 20.1,37.1 20.4,37.4 20.4,37.844 20,38.244 v1(20,38.5)
JTAG_TDI: R90.2 TP2.1 | length 3.1
  L10 w0.114: TP2.1@15.5,43.7 17,42.2 17,41.6 R90.2@16.7,41.3
JTAG_TDI_R: R63.1 R90.1 U1.G5 | length 9.9
  L1 w0.114: v1(24,41.7) 24.8,41.7 U1.G5@25.2,42.1
  L3 w0.12: v1(20.8,40.1) 21.215,40.515 21.759,40.515 21.985,40.741 21.985,41.029 23.056,42.1 23.6,42.1 v1(24,41.7)
  L10 w0.114: R90.1@16.7,40.3 17.3,40.3 17.5,40.1 R63.1@18.6,40.1 v1(20.8,40.1)
JTAG_TDO: R161.2 TP13.1 | length 2
  L10 w0.114: TP13.1@16.7,43.7 16.7,43.5 17,43.2 R161.2@18,42.2
JTAG_TDO_R: R161.1 U1.G6 | length 8.2
  L1 w0.114: v1(24.8,42.5) U1.G6@25.2,42.9
  L3 w0.12: v1(19.3,41.3) 21.8,41.3 22.5,42 22.785,42.285 22.785,42.685 23,42.9 24.4,42.9 v1(24.8,42.5)
  L10 w0.114: R161.1@19,42.2 19,41.6 v1(19.3,41.3)
JTAG_TMS: R64.1 TP5.1 U1.C3 | length 8.7
  L1 w0.114: v1(21.6,40.1) U1.C3@22,40.5
  L3 w0.12: v1(19.3,38.1) 19.3,38.344 19.841,38.885 20.129,38.885 20.959,39.715 21.344,40.1 v1(21.6,40.1)
  L10 w0.114: TP5.1@15.2,38.5 15.9,39.2 R64.1@16.5,39.2 16.544,39.2 17.644,38.1 v1(19.3,38.1)
LED1: R82.1 R94.1 U7.17 | length 40.7
  L1 w0.114: v1(9.5,71.9) 10.1,71.9 R94.1@10.2,71.8 10.3,71.8 10.835,71.265 10.835,68.925 11.1,68.66 11.1,68.2 11.45,67.85 U7.17@12.16,67.85
  L8 w0.12: v1(14.4,85.3) 14.8,85.7 14.8,87.3 16.385,88.885 21.615,88.885 v1(22,88.5)
  L10 w0.114: v1(9.5,71.9) 9.1,72.3 9.1,75.1 9.6,75.6 9.6,76.1 9.3,76.4 8.1,76.4 7.5,77 7.5,77.744 7.3,77.944 7.3,79.8 9.2,81.7 10.206,81.7 10.459,81.447 12.447,81.447 13.7,82.7 13.7,84.6 v1(14.4,85.3) ; v1(22,88.5) 22.7,88.5 22.9,88.7 24.3,88.7 R82.1@25.4,89.8
LED2: R81.1 R102.2 U7.15 | length 13.1
  L1 w0.114: v1(11.5,70.6) 11.115,70.215 11.115,69.041 11.341,68.815 11.7,68.815 11.735,68.85 U7.15@12.16,68.85
  L10 w0.114: R81.1@8,78.3 8.3,78 8.3,76.9 8.5,76.7 9.7,76.7 11.1,75.3 11.1,73.8 10.7,73.4 10.7,71.4 v1(11.5,70.6)
LED_MPCIE_WLAN: J15.44 R268.1 | length 15.2
  L1 w0.114: R268.1@30.5,13.2 30.6,13.1 v1(30.6,12.5) ; v1(35.9,18.5) 36.5,19.1 36.5,19.9 37.4,20.8 v1(37.4,21.4)
  L8 w0.12: v1(30.6,12.5) 30.6,12.8 33.3,15.5 33.3,16.144 34.156,17 34.4,17 v1(35.9,18.5)
  L10 w0.114: v1(37.4,21.4) 37.4,21.544 38.4,22.544 J15.44@38.4,23.6
LED_MPCIE_WPAN: J15.46 R269.1 | length 17.4
  L1 w0.114: R269.1@28.8,11.8 28.8,11.85 v1(29.45,12.5) ; v1(33,19.8) 33.23,19.8 34.04,20.61 34.96,20.61 35.17,20.4 36,20.4 36.735,21.135 36.735,21.675 37.26,22.2 v1(37.4,22.2)
  L8 w0.12: v1(29.45,12.5) 29.45,12.95 30.115,13.615 30.115,14.059 30.756,14.7 31.3,14.7 32.3,15.7 32.3,16.6 32.6,16.9 32.6,19.4 v1(33,19.8)
  L10 w0.114: v1(37.4,22.2) 37.6,22.4 J15.46@37.6,23.6
LED_MPCIE_WWAN: J15.42 R267.1 | length 16.3
  L1 w0.114: R267.1@29.5,14.6 29.544,14.6 30.244,13.9 v1(30.5,13.9) ; v1(35.8,19.3) 35.8,19.7 37.015,20.915 37.015,21.559 37.256,21.8 38.2,21.8 v1(38.6,21.4)
  L8 w0.12: v1(30.5,13.9) 31.1,13.9 32.8,15.6 32.8,16.23 35.8,19.23 v1(35.8,19.3)
  L10 w0.114: v1(38.6,21.4) 38.6,21.656 39.2,22.256 J15.42@39.2,23.6
"LOCAL_PWR / NON_REM0": R219.2 R223.2 U13.28 | length 11.1
  L1 w0.114: U13.28@65.2,75.9 65.2,76.6 65.115,76.685 65.115,77.259 65.7,77.844 v1(65.7,78.4)
  L3 w0.12: v1(64.1,83.9) 64.6,83.4 64.6,80.8 65.3,80.1 65.3,79.3 65.7,78.9 v1(65.7,78.4)
  L10 w0.114: v1(64.1,83.9) 64.3,84.1 R219.2@65,84.1 R223.2@65,85.3
LVDS0_CLK_N: R135.1 U1.V4 | length 35.6
  L1 w0.1: U1.V4@34,41.3 v1(34.4,40.9)
  L3 w0.11: v1(34.4,40.9) 35.453,40.9 37.92,38.433 37.92,37.433 38.12,37.233 38.12,36.08 39.42,34.78 39.42,29.58 40.62,28.38 40.62,28 42.5,26.12 42.5,25.663 42.82,25.343 42.82,16.233 44.26,14.793 44.26,14.14 v1(44.4,14)
  L10 w0.1: v1(44.4,14) 44.26,13.86 44.26,13.6 45.36,12.5 45.36,11.94 R135.1@45.9,11.4
LVDS0_CLK_P: R138.1 U1.V3 | length 35.6
  L1 w0.1: U1.V3@34,40.5 v1(34.4,40.1)
  L3 w0.11: v1(34.4,40.1) 34.4,40.207 34.773,40.58 35.32,40.58 35.8,40.1 35.8,39.65 35.978,39.472 36.428,39.472 37.6,38.3 37.6,37.3 37.8,37.1 37.8,35.947 39.1,34.647 39.1,29.447 40.3,28.247 40.3,27.867 42.18,25.987 42.18,25.53 42.5,25.21 42.5,16.1 43.94,14.66 43.94,14.14 v1(43.8,14)
  L10 w0.1: v1(43.8,14) 43.94,13.86 43.94,13.467 45.04,12.367 45.04,11.94 R138.1@44.5,11.4
LVDS0_CLK_R_N: J12.11 R129.2 R135.2 | length 17.8
  L8 w0.11: v1(37.5,8.8) 37.5,8.893 37.22,9.173 37.22,10.48 36.675,11.025 36.675,11.675 37,12 37.515,12 37.7,12.185 37.7,12.7 38.1,13.1 42.7,13.1 44.08,11.72 44.08,10.927 44.627,10.38 44.827,10.38 45.107,10.1 v1(45.2,10.1)
  L10 w0.1: v1(37.5,8.8) 37.5,8.623 38.6,7.523 J12.11@38.6,6.6 ; v1(45.2,10.1) 45.6,10.1 R135.2@45.9,10.4
LVDS0_CLK_R_P: J12.12 R136.2 R138.2 | length 17.8
  L8 w0.11: v1(36.9,8.8) 36.9,10.347 36.355,10.892 36.355,11.808 37.967,13.42 42.833,13.42 44.4,11.853 44.4,11.06 44.76,10.7 v1(45.2,10.7)
  L10 w0.1: v1(36.9,8.8) 36.9,8.672 37.287,8.285 37.386,8.285 37.735,7.936 37.735,7.735 37.6,7.6 J12.12@37.6,6.6 ; R138.2@44.5,10.4 44.8,10.7 v1(45.2,10.7)
LVDS0_TX0_N: R65.1 U1.U2 | length 35.5
  L1 w0.1: U1.U2@33.2,39.7 v1(33.6,39.3)
  L3 w0.11: v1(33.6,39.3) 33.36,39.06 33.36,38.593 33.72,38.233 33.72,37.843 34.5,37.063 34.5,36.347 33.9,35.747 33.9,34.5 35.226,33.174 35.226,29.126 35.5,28.853 35.5,27.753 36.6,26.653 36.6,25.8 37.08,25.32 37.508,25.32 38.095,24.733 38.095,24.067 37.528,23.5 36.7,23.5 36.4,23.2 36.4,21.453 38.4,19.453 38.4,18.58 38,18.18 38,17.7 38.37,17.33 38.37,16.554 37.816,16 37.4,16 37.1,15.7 37.1,15.153 37.76,14.493 37.76,14.14 v1(37.9,14)
  L10 w0.1: v1(37.9,14) 37.76,13.86 37.76,13.093 38.76,12.093 38.76,11.7 39.06,11.4 R65.1@39.3,11.4
LVDS0_TX0_P: R119.1 U1.U1 | length 35.5
  L1 w0.1: v1(32.8,39.3) U1.U1@33.2,38.9
  L3 w0.11: v1(32.8,39.3) 33.04,39.06 33.04,38.46 33.4,38.1 33.4,37.71 34.18,36.93 34.18,36.48 33.58,35.88 33.58,34.367 34.906,33.041 34.906,28.994 35.18,28.72 35.18,27.62 36.28,26.52 36.28,25.667 36.947,25 37.375,25 37.775,24.6 37.775,24.2 37.395,23.82 36.567,23.82 36.08,23.333 36.08,21.32 38.08,19.32 38.08,18.713 37.68,18.313 37.68,17.567 38.05,17.197 38.05,16.687 37.683,16.32 37.267,16.32 36.78,15.833 36.78,15.02 37.44,14.36 37.44,14.14 v1(37.3,14)
  L10 w0.1: v1(37.3,14) 37.44,13.86 37.44,12.96 38.44,11.96 38.44,11.7 38.14,11.4 R119.1@37.9,11.4
LVDS0_TX1_N: R121.1 U1.U4 | length 35.6
  L1 w0.1: U1.U4@33.2,41.3 v1(33.6,40.9)
  L3 w0.11: v1(33.6,40.9) 33.36,40.66 33.36,40.107 32.933,39.68 32.57,39.68 32.27,39.38 31.68,39.38 30.925,38.625 30.925,38.028 31.353,37.6 31.953,37.6 32.32,37.233 32.32,35.833 32.72,35.433 32.72,33.68 33.22,33.18 33.22,31.98 33.92,31.28 33.92,27.78 34.62,27.08 34.62,26.533 35.12,26.033 35.12,21.08 36.82,19.38 36.82,17.067 35.56,15.807 35.56,13.74 v1(35.7,13.6)
  L10 w0.1: v1(35.7,13.6) 35.56,13.46 35.56,12.793 35.96,12.393 35.96,11.94 R121.1@36.5,11.4
LVDS0_TX1_P: R123.1 U1.U3 | length 35.6
  L1 w0.1: v1(32.8,40.9) U1.U3@33.2,40.5
  L3 w0.11: v1(32.8,40.9) 33.04,40.66 33.04,40.24 32.8,40 32.437,40 32.137,39.7 31.547,39.7 30.605,38.758 30.605,37.895 31.22,37.28 31.82,37.28 32,37.1 32,35.7 32.4,35.3 32.4,33.547 32.9,33.047 32.9,31.847 33.6,31.147 33.6,27.647 34.3,26.947 34.3,26.4 34.8,25.9 34.8,20.947 36.5,19.247 36.5,17.2 35.24,15.94 35.24,13.74 v1(35.1,13.6)
  L10 w0.1: R123.1@35.1,11.4 35.64,11.94 35.64,12.26 35.24,12.66 35.24,13.46 v1(35.1,13.6)
LVDS0_TX2_N: R126.1 U1.V2 | length 35.5
  L1 w0.1: U1.V2@34,39.7 v1(34.4,39.3)
  L3 w0.11: v1(34.4,39.3) 35.153,39.3 36.72,37.733 36.72,35.68 38.32,34.08 38.32,28.98 39.22,28.08 39.22,27.18 39.6,26.8 39.953,26.8 41.42,25.333 41.42,23.167 41.033,22.78 40.38,22.78 40,22.4 40,21.803 40.403,21.4 41.065,21.4 41.52,20.945 41.52,18.967 40.9,18.347 40.9,16.453 42.86,14.493 42.86,14.14 v1(43,14)
  L10 w0.1: v1(43,14) 42.86,13.86 42.86,13.007 42.56,12.707 42.56,11.94 R126.1@43.1,11.4
LVDS0_TX2_P: R128.1 U1.V1 | length 35.5
  L1 w0.1: U1.V1@34,38.9 v1(34.4,38.5)
  L3 w0.11: v1(34.4,38.5) 34.4,38.607 34.773,38.98 35.02,38.98 35.4,38.6 35.4,38.15 35.578,37.972 36.028,37.972 36.4,37.6 36.4,35.547 38,33.947 38,28.847 38.9,27.947 38.9,27.047 39.467,26.48 39.82,26.48 41.1,25.2 41.1,23.3 40.9,23.1 40.247,23.1 39.68,22.533 39.68,21.67 40.27,21.08 40.933,21.08 41.2,20.813 41.2,19.1 40.58,18.48 40.58,16.32 42.54,14.36 42.54,14.14 v1(42.4,14)
  L10 w0.1: R128.1@41.7,11.4 42.24,11.94 42.24,12.84 42.54,13.14 42.54,13.86 v1(42.4,14)
LVDS0_TX3_N: TP19.1 U1.W2 | length 35.5
  L1 w0.1: U1.W2@34.8,39.7 34.8,39.444 35.2,39.044 35.2,38.709 35.8,38.109 v1(35.8,36.4)
  L3 w0.11: v1(35.8,36.4) 35.8,36.307 35.62,36.127 35.62,35.957 35.22,35.557 35.22,35.033 36.6,33.653 36.6,28.653 38.1,27.153 38.1,26.553 39.512,25.141 39.512,23.712 38.2,22.4 38.2,21.263 38.543,20.92 39.033,20.92 39.9,20.053 39.9,18.9 39.6,18.6 39.6,15.853 41.12,14.333 41.12,13.567 40.653,13.1 40.353,13.1 39.95,12.697 39.95,12.303 40.71,11.543 40.71,10.99 v1(41,10.7)
  L10 w0.1: TP19.1@40.5,11.2 v1(41,10.7)
LVDS0_TX3_P: TP20.1 U1.W1 | length 35.5
  L1 w0.1: U1.W1@34.8,38.9 34.8,38.657 35.46,37.997 35.46,37.83 35.33,37.7 35.058,37.7 34.858,37.5 34.858,37.3 35.058,37.1 35.33,37.1 35.48,36.95 35.48,36.78 35.2,36.5 v1(35.2,36.4)
  L3 w0.11: v1(35.2,36.4) 35.3,36.3 35.3,36.09 34.9,35.69 34.9,34.9 36.28,33.52 36.28,28.52 37.78,27.02 37.78,26.42 39.192,25.008 39.192,23.845 37.88,22.533 37.88,21.13 38.41,20.6 38.9,20.6 39.58,19.92 39.58,19.033 39.28,18.733 39.28,15.72 40.8,14.2 40.8,13.7 40.52,13.42 40.22,13.42 39.63,12.83 39.63,12.17 40.39,11.41 40.39,11.09 v1(40,10.7)
  L10 w0.1: v1(40,10.7) TP20.1@40.5,10.2
MCU_BTN: C314.1 D35.1 R149.1 R390.2 | length 19.7
  L10 w0.114: R390.2@2.3,57 2.8,57 3.3,56.5 3.8,56.5 4.02,56.72 5.42,56.72 5.9,57.2 6.8,57.2 7.4,56.6 8,56.6 9.2,57.8 10.6,57.8 11.2,58.4 C314.1@12.1,58.4 14.5,58.4 15.1,59 16,59 16.9,59.9 D35.1@17.981,59.9 18.044,59.9 18.685,59.259 18.685,58.485 R149.1@18.6,58.4
MCU_GPIO0: R227.1 U6.12 | length 41.6
  L3 w0.12: v1(11,27.3) 11.6,27.9 11.6,31.9 10.9,32.6 10.9,34.012 10.315,34.597 10.315,35.159 11,35.844 v1(11,41.2)
  L8 w0.12: v1(11,27.3) 11,26.9 11.155,26.745 11.155,25.845 12.2,24.8 12.894,24.8 14.635,23.059 14.635,22.865 16.4,21.1 16.4,17.075 16.015,16.69 16.015,15.985 v1(18.6,13.4)
  L10 w0.114: R227.1@7.7,43.2 8.6,42.3 10.4,42.3 11,41.7 v1(11,41.2) ; v1(18.6,13.4) 18.9,13.4 19.4,13.9 19.4,16.044 18.925,16.519 U6.12@18.925,17.15
MCU_GPIO1: R228.1 U6.28 | length 21.2
  L3 w0.12: v1(8.3,32.9) 8.7,32.5 10.1,32.5 11,31.6 11,27.985 10.615,27.6 10.615,27.1 11.199,26.516 12.084,26.516 13.4,25.2 16.21,25.2 17.51,26.5 v1(18.3,26.5) ; v1@18.25,26.55 v1@18.3,26.6
  L10 w0.114: R228.1@7.6,33.1 8,33.1 8.1,33.1 v1(8.3,32.9) ; U6.28@18.275,23.85 18.275,24.281 17.365,25.191 17.365,25.559 17.415,25.609 17.415,25.615 v1(18.3,26.5)
MCU_GPIO2: R148.1 R205.2 R273.1 U6.9 | length 39.5
  L8 w0.12: v1(8.3,32) 8.6,32.3 10.2,32.3 10.86,31.64 10.86,28.06 10.5,27.7 10.5,26.8 10.82,26.48 10.82,25.48 11.815,24.485 12.484,24.485 13.806,23.163 13.806,22.8 14.106,22.5 14.4,22.5 15.9,21 15.9,17.4 15.7,17.2 15.7,15.5 18,13.2 18.256,13.2 v1@19.55,11.906 ; v1(19.55,11.85) v1@19.55,11.906 ; v1@19.6,11.856 v1@19.55,11.906
  L10 w0.114: R148.1@5.2,33.3 5.2,31.4 5.7,30.9 R205.2@6.2,30.9 R273.1@7.6,30.9 7.9,30.9 8.12,31.12 8.12,31.82 v1(8.3,32) ; v1(19.55,11.85) 19.55,12.15 20.875,13.475 U6.9@20.875,17.15
MCU_ISPN: R204.2 R213.1 U1.B21 | length 72.1
  L1 w0.114: v1(16.9,55.8) 16.9,55.5 17.275,55.125 17.875,55.125 17.963,55.037 19.163,55.037 19.7,54.5 20.8,54.5 U1.B21@21.2,54.9
  L8 w0.12: v1(16.9,55.8) 17.156,55.544 17.156,54.5 16.685,54.029 16.685,53.641 13.9,50.856 13.9,50.1 14.085,49.915 14.085,49.441 13.844,49.2 13.4,49.2 12.6,48.4 12.6,46.204 12.985,45.819 12.985,45.1 12.785,44.9 12.785,39.341 12.6,39.156 12.6,36.7 12.915,36.385 12.915,34.985 13.315,34.585 13.315,33.385 13.9,32.8 15,32.8 16.7,31.1 16.7,30.5 16.9,30.3 17.2,30.3 17.7,29.8 17.7,26.685 17.3,26.285 17.3,24.1 18.8,22.6 19.3,22.1 19.3,20.9 19.6,20.6 19.6,14.8 23.3,11.1 23.3,9.3 26.1,6.5 27.3,6.5 v1(27.8,6)
  L10 w0.114: R213.1@27.5,11.3 28.4,10.4 R204.2@28.6,10.4 28.6,9.2 28.1,8.7 28.1,6.3 v1(27.8,6)
MCU_RSTINN: R212.1 U1.A21 U21.1 U21.2 | length 54.2
  L1 w0.114: v1(16.2,56.2) 16.2,56.7 16.4,56.9 16.4,56.756 16.971,56.185 17.059,56.185 17.385,55.859 17.385,55.615 17.595,55.405 19.351,55.405 19.841,54.915 ; v1(17.3,28.6) 17.3,28.3 17.9,27.7 17.9,26.3 16.22,24.62 15.794,24.62 15.18,24.006 15.18,23.724 14.915,23.459 14.915,20.985 15.9,20 16.9,20 17.4,20.5 ; U21.2@17.95,20.6 17.5,20.6 17.4,20.5 ; U21.1@17.95,21.25 17.55,21.25 17.4,21.1 17.4,20.5 ; 19.841,54.915 19.856,54.9 U1.A21@20.4,54.9 20.4,54.915 19.841,54.915
  L8 w0.12: v1(16.2,56.2) 16.2,55.944 16.644,55.5 16.644,54.5 16.344,54.2 16.1,54.2 14.8,52.9 14.8,52.456 13.525,51.181 13.525,50.025 13.315,49.815 13.315,49.619 12.215,48.519 12.215,45.315 11.9,45 11.9,42.1 12.3,41.7 12.3,40.1 11.815,39.615 11.815,36.485 12.6,35.7 12.6,32.9 13.6,31.9 14.7,31.9 15.3,31.3 15.956,31.3 16.4,30.856 16.4,29.956 17.3,29.056 v1(17.3,28.6)
MCU_RSTINN_BUFF: R270.1 R281.1 U6.2 U21.4 | length 12
  L1 w0.114: R281.1@16.3,21.6 16.7,21.6 16.9,21.8 18.3,21.8 18.9,21.2 18.9,19.1 R270.1@19.2,18.8 19.85,19.45 U21.4@19.85,19.95 20.25,19.95 20.7,20.4 21.1,20.4 21.6,20.9 21.6,21.3 22.3,22 v1(22.9,22)
  L10 w0.114: U6.2@21.95,22.125 22.775,22.125 22.8,22.1 v1(22.9,22)
MCU_RSTOUTN: R93.1 U6.16 | length 36.9
  L8 w0.12: v1(11,43.8) 11,42 11.4,41.6 11.4,40.9 11,40.5 11,35.344 11.185,35.159 11.185,32.7 11.3,32.585 11.3,27.644 11.435,27.509 11.435,26.709 13.644,24.5 14.6,24.5 14.915,24.185 14.915,23.141 15.4,22.656 15.7,22.656 17.385,20.971 17.385,17.285 v1(16.4,16.3)
  L10 w0.114: v1(11,43.8) 11.735,44.535 12.465,44.535 14.1,42.9 R93.1@14.1,42.6 ; U6.16@16.325,17.15 16.325,16.375 v1(16.4,16.3)
MCU_RSTOUTN_R: R69.1 R93.2 R271.2 U8.2 | length 4.1
  L10 w0.114: U8.2@12.3,40.25 12.3,40.8 R69.1@12.9,41.4 13.015,41.515 15.5,41.515 R271.2@15.5,41.6
MCU_SWDIO: TP31.1 U1.P1 U25.3 | length 105.6
  L1 w0.114: v1(10.9,20.4) 11.42,20.92 11.42,22.72 U25.3@11.55,22.85 ; U1.P1@30.8,38.9 30.8,37 31,36.8 v1(31,36.3)
  L3 w0.12: v1(10.9,20.4) 11.756,20.4 12.541,19.615 13.115,19.615 13.28,19.78 14.66,19.78 15.7,18.74 15.7,17.3 15.3,16.9 15.3,15.964 17.865,13.399 17.865,12.491 18.365,11.991 18.365,11.791 18.63,11.526 18.87,11.526 18.929,11.585 19.259,11.585 19.6,11.244 19.6,10.8 22.485,7.915 22.641,7.915 23.456,7.1 25.2,7.1 25.5,6.8 28.1,6.8 29,5.9 29,5.656 30.456,4.2 33.9,4.2 34.4,3.7 36.9,3.7 37.1,3.5 40.5,3.5 43.2,3.5 43.7,4 47,4 47.8,4.8 48.344,4.8 48.6,5.056 48.6,5.9 49,6.3 49,7.1 49.5,7.6 49.5,8.31 50.758,9.568 50.758,10.458 51.531,11.231 51.531,12.831 54.333,15.633 54.333,17.333 54.7,17.7 54.7,18.2 53.9,19 49.8,19 48.4,20.4 47.1,20.4 46.4,21.1 v1(46.4,21.4)
  L8 w0.12: v1(31,36.3) 31.7,36.3 35.415,32.585 35.415,29.441 36.3,28.556 36.3,26.256 39.956,22.6 42.5,22.6 44.085,21.015 46.015,21.015 v1(46.4,21.4)
  L10 w0.114: TP31.1@30.2,36.1 30.8,36.1 v1(31,36.3)
MCU_SWDIO_SEL: R289.1 U1.N2 U25.6 | length 111.9
  L1 w0.114: v1(11.7,19.8) 12.3,20.4 12.3,20.515 R289.1@12.4,20.515 ; R289.1@12.4,20.6 12.8,20.6 14.635,22.435 14.635,23.575 14.9,23.84 14.9,24.2 14.615,24.485 13.985,24.485 13.65,24.15 U25.6@13.45,24.15 ; U1.N2@30,39.7 30.4,39.3 v1(30.4,36.8)
  L3 w0.12: v1(11.7,19.8) 12.165,19.335 13.4,19.335 13.565,19.5 14.385,19.5 15.285,18.6 15.285,17.5 14.9,17.115 14.9,15.9 17.585,13.215 17.585,12.375 18.085,11.875 18.085,11.671 22.256,7.5 22.66,7.5 23.46,6.7 25.019,6.7 25.319,6.4 28.104,6.4 28.585,5.919 28.585,5.675 30.46,3.8 32.415,3.8 32.8,3.415 34.25,3.415 34.515,3.15 44.95,3.15 45.3,3.5 47.644,3.5 49,4.856 49,5.7 49.9,6.6 49.9,8.1 51.115,9.315 51.115,10.159 51.877,10.921 51.877,12.677 54.767,15.567 54.767,17.167 55.2,17.6 55.2,18.5 54.3,19.4 50,19.4 48.7,20.7 47.356,20.7 46.815,21.241 46.815,21.585 46.6,21.8 46,21.8 v1(45.6,21.4)
  L8 w0.12: v1(30.4,36.8) 30.8,37.2 31.9,37.2 32.3,36.8 32.3,36.3 36.29,32.31 36.29,29.21 36.7,28.8 36.7,26.5 37.1,26.1 37.544,26.1 37.8,25.844 37.8,25.3 40.117,22.983 42.617,22.983 44.2,21.4 v1(45.6,21.4)
MCU_XTALIN: C223.2 U6.4 Y5.1 | length 6.3
  L10 w0.114: U6.4@21.95,20.825 22.769,20.825 23.5,20.094 C223.2@23.5,20 23.5,19.4 23.835,19.065 24.159,19.065 24.394,19.3 25.5,19.3 26.55,20.35 Y5.1@26.55,20.4
MCU_XTALOUT: C224.2 U6.5 Y5.3 | length 4.2
  L10 w0.114: U6.5@21.95,20.175 22.331,20.175 22.691,19.815 22.885,19.815 23.2,19.5 23.2,19.2 23.4,19 C224.2@23.4,18.7 23.715,18.385 24.85,18.385 Y5.3@24.85,18.2
MIC_BIAS: C293.1 R235.1 U14.16 | length 7.3
  L1 w0.3: v1(47.9,8.55) 48.8,7.65 50.95,7.65 51.3,7.3 52.06,7.3 52.08,7.28 v1(52.1,7.3)
  L10 w0.3: v1(47.9,8.55) U14.16@48.35,8.55 ; v1(52.1,7.3) 52.5,7.7 C293.1@52.8,7.7 53.5,7.7 R235.1@53.9,8.1
MIC_IN: C294.1 U14.15 | length 8.4
  L1 w0.3: v1(49.4,6.8) 49.407,6.793 52.3,6.793 52.7,7.193 52.7,7.396 53.194,7.89 54.39,7.89 v1(54.6,8.1)
  L10 w0.3: U14.15@48.85,8.55 48.85,8.103 49.4,7.553 v1(49.4,6.8) ; v1(54.6,8.1) C294.1@55.2,8.1
MIC_IN_C: C294.2 FB18.1 R235.2 | length 2.9
  L10 w0.3: R235.2@53.9,9.1 C294.2@55.2,9.1 55.3,9.1 56.3,8.1 FB18.1@56.4,8.1
MIC_LINEIN_L: TP7.1 U14.14 | length 1.6
  L10 w0.2: U14.14@49.35,8.55 49.35,8.183 50.1,7.433 TP7.1@50.1,7.3
MIC_LINEIN_R: TP41.1 U14.13 | length 1.9
  L10 w0.2: U14.13@49.85,8.55 49.85,8.192 50.142,7.9 50.5,7.9 51,7.4 TP41.1@51,7.3
MPCIE_SIM_C4: J17.C4 R104.1 | length 18.7
  L1 w0.114: R104.1@47.2,17.4 46.7,17.9 46.7,19.2 46.9,19.4 v1(47.3,19.4)
  L3 w0.12: v1(47.3,19.4) 47.152,19.4 45.952,20.6 45.445,20.6 44.9,21.145 44.9,23.5 46.1,24.7 46.1,25.9 46.785,26.585 47.87,26.585 48.355,26.1 v1(48.4,26.1)
  L10 w0.114: J17.C4@48.1,30.5 48,30.4 48,29.6 47.7,29.3 47.7,27.1 47.715,27.085 47.715,26.741 48.355,26.1 v1(48.4,26.1)
MPCIE_SIM_C4_R: J15.19 R104.2 | length 2.7
  L1 w0.114: R104.2@48.2,17.4 48.3,17.4 v1(48.9,16.8)
  L10 w0.114: J15.19@48.4,15.4 48.4,16.6 48.6,16.8 v1(48.9,16.8)
MPCIE_SIM_C8: J17.C8 R67.1 | length 15.4
  L1 w0.114: R67.1@48.2,18.6 R67.1@48.2,18.8 ; R67.1@48.2,18.7 v1(48.2,19.4)
  L3 w0.12: v1(47.4,26.2) 47.8,25.8 47.8,25.1 45.2,22.5 45.2,21.256 45.556,20.9 46.1,20.9 47,20 47.6,20 v1(48.2,19.4)
  L10 w0.114: J17.C8@46.83,30.5 46.885,30.445 46.885,26.715 v1(47.4,26.2)
MPCIE_SIM_C8_R: J15.17 R67.2 | length 4.9
  L1 w0.114: R67.2@47.2,18.7 47.2,18.5 47.6,18.1 v1(48.7,18.1)
  L10 w0.114: v1(48.7,18.1) 49.3,17.5 49.3,15.5 J15.17@49.2,15.4
MPCIE_SIM_CLK: D15.4 J15.12 J17.C3 | length 18.4
  L10 w0.114: J17.C3@50.64,30.5 50.64,29.84 50.3,29.5 49.5,29.5 49.3,29.3 49.3,28.3 49.5,28.1 49.9,28.1 50.1,27.9 50.1,27.7 50.4,27.4 51.034,27.4 51.2,27.234 51.2,26.5 50.7,26 D15.4@50.55,26 50.4,26 50.1,25.7 50.1,25.2 50.207,25.093 50.207,23.808 51.3,22.716 51.3,22.4 51.05,22.15 51.05,21.85 51.7,21.2 54.12,21.2 54.4,21.48 54.4,21.756 54.1,22.056 54.1,22.4 54.4,22.7 J15.12@54.4,23.6
MPCIE_SIM_DATA: D15.5 J15.10 J17.C7 | length 18.4
  L10 w0.114: J17.C7@49.37,30.5 49.37,30.37 48.5,29.5 48.5,28.3 48.7,28.1 49.044,28.1 49.3,27.844 49.3,27.556 49.556,27.3 50.06,27.3 50.36,27 D15.5@50.4,27 ; D15.5@50.55,27 D15.5@50.4,27 ; J15.10@55.2,23.6 55.2,22.7 54.9,22.4 54.9,21.5 54.2,20.8 51.5,20.8 50.5,21.8 50.5,22.8 49.8,23.5 49.8,26.4 D15.5@50.4,27
MPCIE_SIM_RST: D15.1 J15.14 J17.C2 | length 13.4
  L10 w0.114: J17.C2@53.18,30.5 53.18,29.98 52.5,29.3 52.5,27.488 D15.1@52.05,27.038 51.891,27.038 51.48,26.627 51.48,26.143 50.9,25.563 50.9,25 50.615,24.715 50.615,24.085 52.285,22.415 52.285,21.915 52.5,21.7 53.1,21.7 53.3,21.9 53.3,22.366 53.6,22.666 J15.14@53.6,23.6
NetC284_2: C284.2 R232.2 | length 1.1
  L10 w0.3: C284.2@63.5,8 63.5,8.4 63.7,8.6 R232.2@63.7,9
NetC285_2: C285.2 R233.2 | length 1.2
  L10 w0.3: C285.2@56.4,3.7 56.39,3.69 56.39,2.61 R233.2@56.5,2.5
NetC382_1: C382.1 D39.1 R141.1 R348.1 | length 8.1
  L10 w0.114: R348.1@1.4,31.1 2.4,31.1 2.6,30.9 2.6,30.4 2.3,30.1 R141.1@1.4,30.1 1.3,30.1 0.8,29.6 0.8,26.6 1.5,25.9 D39.1@1.5,25.719
NetC390_2: C390.2 R311.1 U22.3 | length 2.7
  L1 w0.3: U22.3@62.475,16.9 62.879,16.9 63.579,17.6 C390.2@63.6,17.6 63.6,18.7 R311.1@63.5,18.8
NetC411_1: C411.1 R344.2 | length 1.3
  L10 w0.4: C411.1@14.9,35.7 14.875,35.725 14.875,36.975 R344.2@14.9,37
NetC433_1: C433.1 R408.2 | length 1.1
  L10 w0.4: R408.2@10.5,93.8 C433.1@11.6,93.8
NetD11_1: D11.1 R267.2 | length 3.7
  L1 w0.114: R267.2@30.5,14.6 31.015,14.085 31.015,11.985 31.4,11.6 D11.1@31.4,11.3
NetD13_1: D13.1 R190.1 | length 1.3
  L1 w0.114: R190.1@40.7,76.6 40.7,75.419 D13.1@40.8,75.319
NetD14_1: D14.1 R185.1 | length 1.6
  L1 w0.114: R185.1@49.6,2.3 50,2.3 50.4,2.7 50.8,2.7 D14.1@51,2.7
NetD25_1: D25.1 R268.2 | length 4.6
  L1 w0.114: R268.2@29.5,13.2 29.5,13 30.7,11.8 30.7,10.1 D25.1@31.4,9.4
NetD26_1: D26.1 R269.2 | length 5
  L1 w0.114: R269.2@29.8,11.8 30.4,11.2 30.4,9.9 30.6,9.7 30.6,8.3 D26.1@31.4,7.5
NetJ5_14: J5.14 R182.1 | length 2.5
  L1 w0.3: J5.14@38.5,85.44 v1(38.5,87.1)
  L10 w0.4: R182.1@37.8,87.4 38.2,87.4 v1(38.5,87.1)
NetQ5_3: Q5.3 R186.2 | length 13.4
  L10 w0.114: R186.2@24.9,3.2 25.6,3.2 26.5,4.1 27.5,4.1 28.115,4.715 28.115,5.6 28.45,5.935 28.45,7.05 28.9,7.5 28.9,9.692 29.18,9.972 29.18,11.676 28.856,12 28.5,12 28.25,12.25 Q5.3@28.25,13.2
NetQ6_3: Q6.3 R185.2 | length 17.1
  L1 w0.114: R185.2@49.6,1.3 v1(50.2,1.3) ; v1(63,5.7) Q6.3@63,6.45 Q6.3@63.1,6.55
  L3 w0.12: v1(50.2,1.3) 51.2,1.3 51.9,2 55.8,2 56.3,2.5 56.3,4.1 57.9,5.7 v1(63,5.7)
NetQ10_1: Q10.1 R293.2 | length 1.5
  L10 w0.114: R293.2@15.7,1.2 16.2,1.2 16.35,1.35 Q10.1@17.1,1.35
NetQ14_3: Q14.3 R387.1 | length 4.8
  L10 w0.3: Q14.3@14.9,16.2 14.1,15.4 14.1,14.5 14.8,13.8 14.8,13.382 15.582,12.6 R387.1@15.8,12.6
NetR100_1: R100.1 R293.1 U27.1 | length 8.7
  L10 w0.3: R293.1@15.7,2.2 16.3,2.8 16.3,3.8 16.6,4.1 17.828,4.1 18.75,5.022 R100.1@18.75,5.2 18.75,6.75 20.05,8.05 U27.1@20.05,8.4
NetR109_2: R109.2 U15.7 | length 1.2
  L1 w0.114: R109.2@31.8,69.3 31.865,69.235 U15.7@31.865,68.15
NetR244_1: R244.1 U15.3 | length 3.4
  L1 w0.114: R244.1@32.3,59.8 32.6,59.8 32.9,60.1 32.9,61.5 33.135,61.735 U15.3@33.135,62.65
NetR292_1: R292.1 R296.2 U27.2 | length 5.8
  L10 w0.3: R292.1@20.2,9.7 20.21,9.69 20.71,9.69 U27.2@21.975,8.425 ; R296.2@21.3,5.2 21.417,5.2 21.95,5.733 U27.2@21.95,8.4
ON_OFF: R48.1 TP3.1 U1.D12 | length 12.7
  L1 w0.114: v1(22.4,47.3) U1.D12@22.8,47.7
  L3 w0.12: v1(13.6,44.2) 14.3,44.2 15.058,44.957 15.657,44.957 16.315,45.615 18.059,45.615 18.944,46.5 21.74,46.5 22.4,47.16 v1(22.4,47.3)
  L10 w0.114: R48.1@13.3,45.1 13.3,44.5 v1(13.6,44.2) 14.1,43.7 TP3.1@14.3,43.7
PCIE_C_TX_N: C63.1 U1.A3 | length 2.9
  L1 w0.114: C63.1@18.7,39.1 19.2,39.6 19.2,40.313 19.47,40.583 19.7,40.583 19.973,40.31 20.21,40.31 U1.A3@20.4,40.5
PCIE_C_TX_P: C65.1 U1.B3 | length 2.9
  L1 w0.114: C65.1@18.7,40.2 19.357,40.857 20.548,40.857 20.905,40.5 U1.B3@21.2,40.5
PCIE_CLK_C_N: C66.1 U1.C7 | length 9
  L1 w0.1: C66.1@17.7,37.9 17.7,38.22 17.9,38.42 v1(17.9,38.5) ; v1(21.6,43.3) U1.C7@22,43.7
  L3 w0.11: v1(17.9,38.5) 18,38.6 18,39.653 18.38,40.033 18.38,41.47 19.43,42.52 21.43,42.52 21.84,42.93 21.84,43.124 21.664,43.3 v1(21.6,43.3)
PCIE_CLK_C_P: C67.1 U1.D7 | length 9
  L1 w0.1: v1(18.5,38.5) 18.5,38.42 18.7,38.22 C67.1@18.7,37.9 ; v1(22.4,43.3) U1.D7@22.8,43.7
  L3 w0.11: v1(18.5,38.5) 18.32,38.68 18.32,39.52 18.7,39.9 18.7,41.337 19.563,42.2 21.563,42.2 22.16,42.797 22.16,43.06 v1(22.4,43.3)
PCIE_CLK_N: C66.2 J15.11 R17.2 | length 74.2
  L1 w0.1: C66.2@17.7,36.9 R17.2@17.7,35.8 17.9,35.6 v1(17.9,35.1)
  L3 w0.11: v1(17.9,35.1) 18.04,34.96 18.04,31.307 19.3,30.047 19.3,26.8 18.13,25.63 18.13,21.117 19,20.247 19,17.447 21.3,15.147 21.3,12.647 25.767,8.18 28.62,8.18 31.42,5.38 45.383,5.38 47.42,7.417 47.42,9.12 49.82,11.52 49.82,12.92 50.72,13.82 50.72,14.42 51.32,15.02 51.32,16.12 52.26,17.06 52.26,17.96 v1(52.4,18.1)
  L10 w0.1: v1(52.4,18.1) 52.26,17.96 52.26,17.74 52.505,17.495 54.158,17.495 54.56,17.093 54.56,16.69 54.8,16.45 J15.11@54.8,15.4
PCIE_CLK_P: C67.2 J15.13 R16.2 | length 74.2
  L1 w0.1: v1(18.5,35.1) 18.5,35.6 R16.2@18.7,35.8 C67.2@18.7,36.9
  L3 w0.11: v1(18.5,35.1) 18.36,34.96 18.36,31.44 19.62,30.18 19.62,26.667 18.45,25.497 18.45,21.25 19.32,20.38 19.32,17.58 21.62,15.28 21.62,12.78 25.9,8.5 28.753,8.5 31.553,5.7 45.25,5.7 47.1,7.55 47.1,9.253 47.724,9.876 47.724,10.1 47.45,10.374 47.45,10.65 47.65,10.85 47.926,10.85 48.2,10.576 48.424,10.576 49.5,11.653 49.5,13.053 50.4,13.953 50.4,14.553 51,15.153 51,16.253 51.94,17.193 51.94,17.96 v1(51.8,18.1)
  L10 w0.1: v1(51.8,18.1) 51.94,17.96 51.94,17.607 52.372,17.175 54.025,17.175 54.24,16.96 54.24,16.69 54,16.45 J15.13@54,15.4
PCIE_REXT: R37.2 U1.A2 | length 1.4
  L1 w0.4: v1(20,39.3) U1.A2@20.4,39.7
  L10 w0.4: v1(20,39.3) 20.1,39.4 R37.2@20.8,39.4
PCIE_RSTN: J15.22 R158.2 R170.1 | length 125.8
  L1 w0.114: v1(3.4,15.2) 3.8,15.6 3.8,18.4 4.085,18.685 4.085,19.159 3.8,19.444 3.8,20.256 5.5,21.956 5.5,22.936 6.6,24.036 6.6,24.4 7.35,25.15 7.35,26.17 7.12,26.4 7.12,28.02 7.3,28.2 7.3,29.9 7.157,30.043 7.157,33.443 6.4,34.2 6.4,35.8 6.8,36.2 6.8,36.9 7.2,37.3 10,37.3 v1(10.4,37.7) ; v1(48,22.2) R170.1@48,23.9
  L3 w0.12: v1(3.4,15.2) 2.8,14.6 2.8,12.8 5.7,9.9 5.7,9.356 8.685,6.371 8.685,4.559 8.985,4.259 8.985,3.815 10.465,2.335 12.665,2.335 13.185,1.815 13.559,1.815 13.844,2.1 17.3,2.1 19.4,4.2 21.7,4.2 22.1,3.8 23.3,3.8 23.7,3.4 29.672,3.4 30.572,2.5 33.475,2.5 33.875,2.1 47.756,2.1 48.741,3.085 49.585,3.085 51.2,4.7 51.2,6.2 51.8,6.8 52.144,6.8 52.8,7.456 52.8,8.9 52.915,9.015 52.915,12.409 53.3,12.794 53.935,12.794 54.455,13.315 55.015,13.315 56.5,14.8 56.5,19.6 55.2,20.9 50.6,20.9 49.7,21.8 48.4,21.8 v1(48,22.2)
  L10 w0.114: v1(10.4,37.7) 10.9,38.2 10.9,39.1 11.196,39.396 11.896,39.396 12.292,39 12.9,39 13.5,39.6 13.5,40.3 13.8,40.6 R158.2@14,40.6 ; R158.2@14.1,40.6 R158.2@14,40.6 ; R158.2@14.1,40.7 R158.2@14,40.6 ; J15.22@47.2,23.6 47.2,22.744 47.744,22.2 v1(48,22.2)
PCIE_RSTN_R: R170.2 U1.V5 | length 28.8
  L1 w0.114: U1.V5@34,42.1 34.4,41.7 35.8,41.7 36,41.5 36,41.1 36.2,40.9 36.6,40.9 36.815,40.685 36.815,37.941 37.015,37.741 37.015,35.485 37.985,34.515 37.985,32.985 v1(37.1,32.1) ; v1(46.8,25) 47,24.8 R170.2@47,23.9
  L10 w0.114: v1(37.1,32.1) 37.6,31.6 42.6,31.6 43.3,30.9 43.9,30.9 45.3,29.5 45.3,28.8 45.3,27.144 46.044,26.4 46.044,25.611 46.656,25 v1(46.8,25) v1@46.9,25
PCIE_RX_N: J15.23 U1.B1 | length 83.6
  L1 w0.114: v1(20.3,36.2) 20.242,36.258 20.242,36.555 20.674,36.987 20.674,37.274 20.8,37.4 21.04,37.4 21.19,37.55 21.19,37.85 21.04,38 20.8,38 20.674,38.126 20.674,38.491 21.083,38.9 U1.B1@21.2,38.9
  L3 w0.13: v1(20.3,36.2) 20.221,36.121 20.1,36.121 19.999,36.02 19.999,35.554 21.02,34.533 21.02,33.92 20.5,33.4 20.5,32.953 21.01,32.443 21.01,27.934 21.324,27.62 22.033,27.62 22.82,26.833 22.82,26.267 22.453,25.9 21,25.9 20.7,25.6 20.7,25 20.88,24.82 21.933,24.82 22.42,24.333 22.42,23.567 21.953,23.1 20.05,23.1 19.7,22.75 19.7,21.85 20.13,21.42 21.88,21.42 22.42,20.88 22.42,19.72 21.89,19.19 20.69,19.19 20.4,18.9 20.4,18.4 20.88,17.92 22.633,17.92 23.11,17.443 23.11,13.19 24.88,11.42 25.58,11.42 27.18,9.82 29.38,9.82 31.78,7.42 34.033,7.42 34.453,7 44.447,7 45.03,7.583 45.03,8.457 44.48,9.007 44.48,11.033 44.947,11.5 46.1,11.5 46.967,12.367 47.915,12.367 48.156,12.608 48.156,13.5 47.956,13.7 47.573,13.7 47.373,13.9 47.373,14.2 47.573,14.4 47.956,14.4 48.156,14.6 48.156,15.5 47.956,15.7 47.648,15.7 47.448,15.9 47.448,16.2 47.648,16.4 47.956,16.4 48.156,16.6 48.156,17.044 47.62,17.58 46.633,17.58 46.42,17.367 46.42,17.159 46.7,16.879 v1(46.7,16.8)
  L10 w0.114: v1(46.7,16.8) 46.7,16.59 46.8,16.49 J15.23@46.8,15.4